# Altium PCB Proiect Dina.PcbDoc
Units mm, origin at the board's own origin, x right, y up, seen from the top; angles counter-clockwise.
Board outline 157.5 x 144.5 mm, 2 copper layers (Top Layer, Bottom Layer); 55 components, 34 nets, 132 pads, 69 vias.
Unrouted connection lines stored in the file: 9.
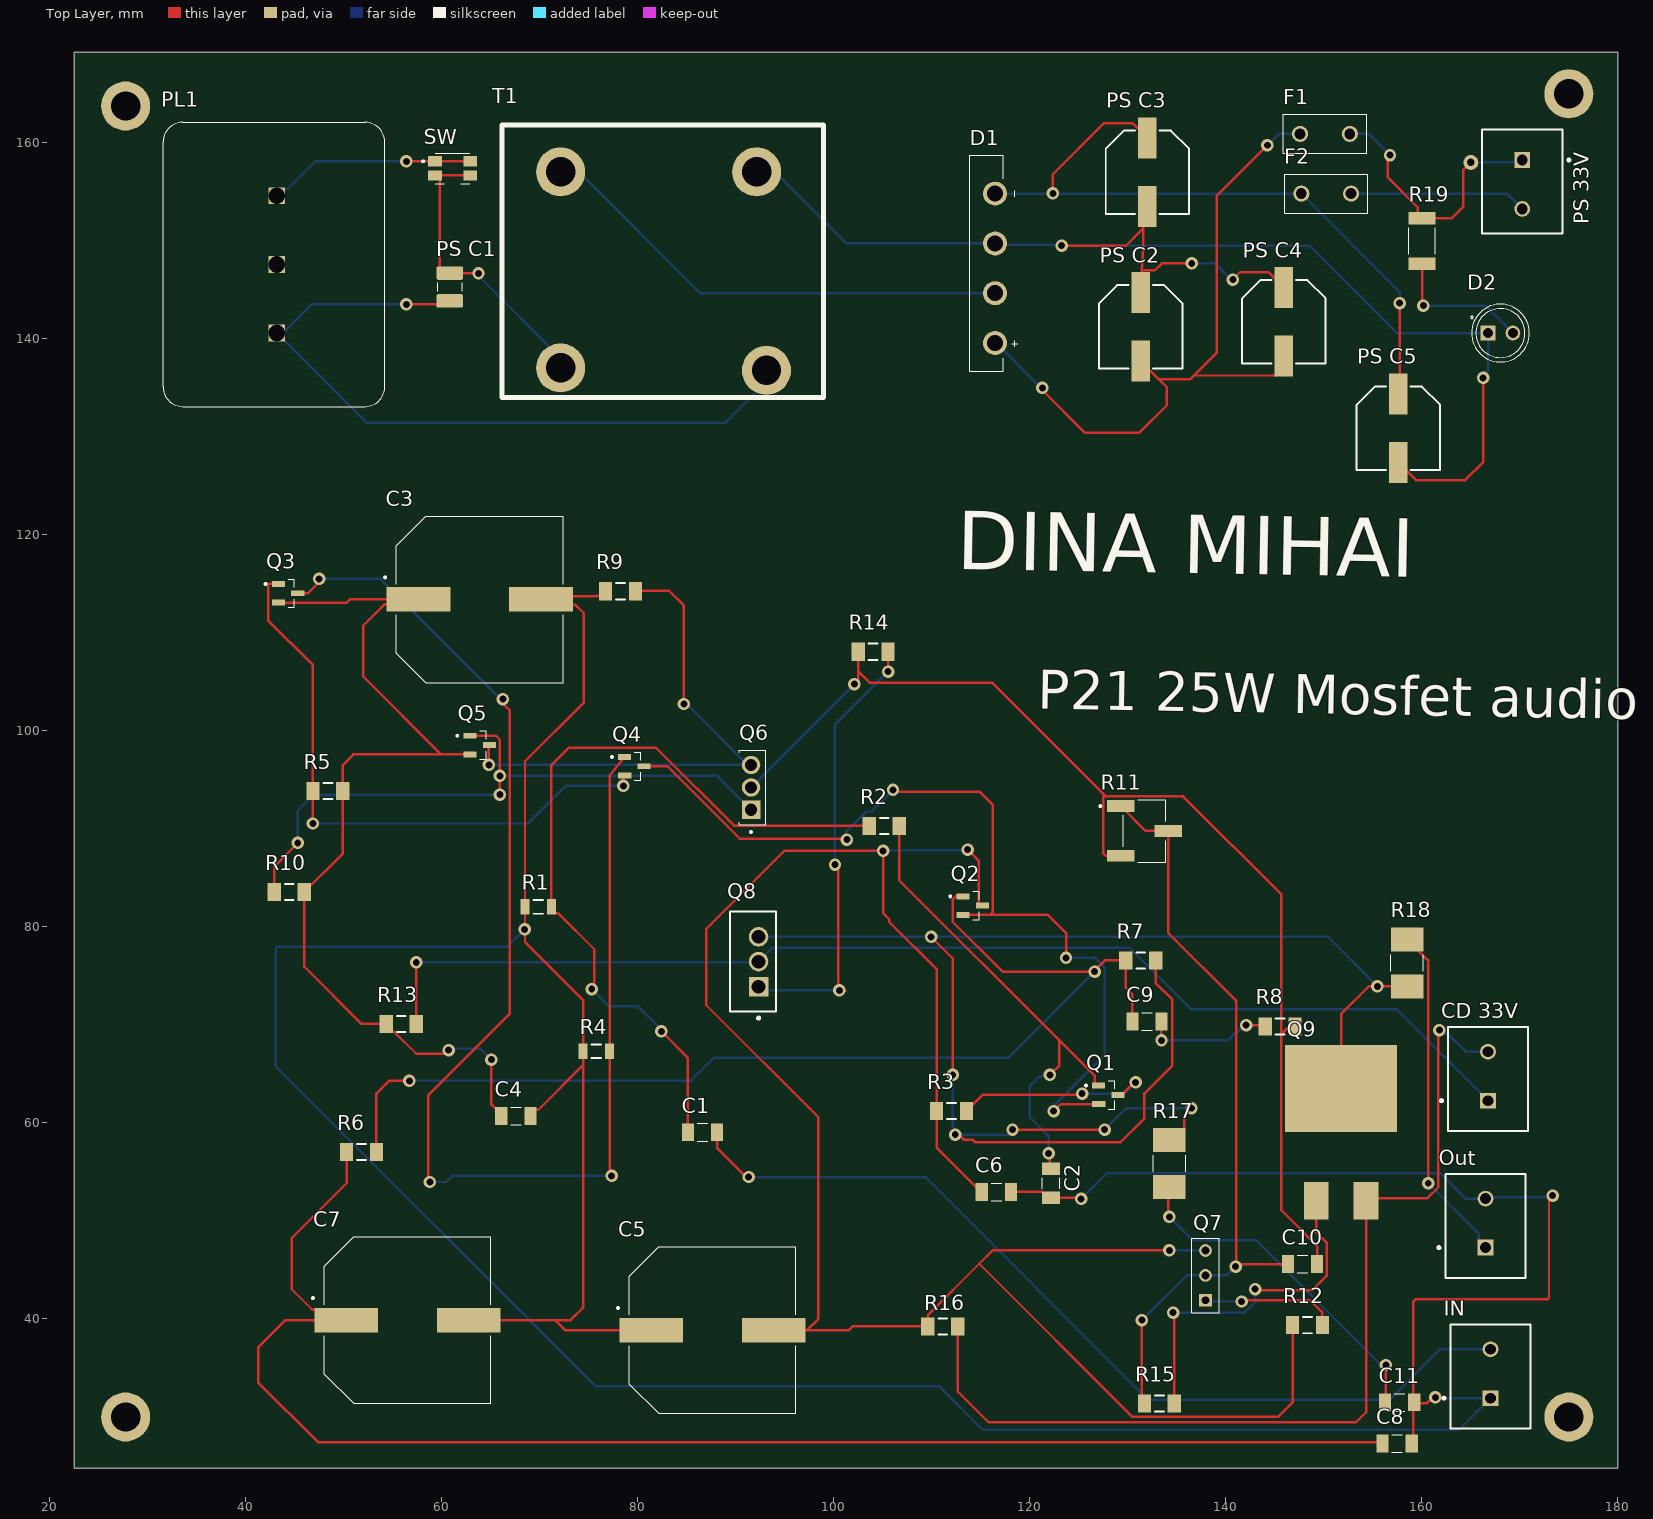
[diagram p0: Top Layer view]
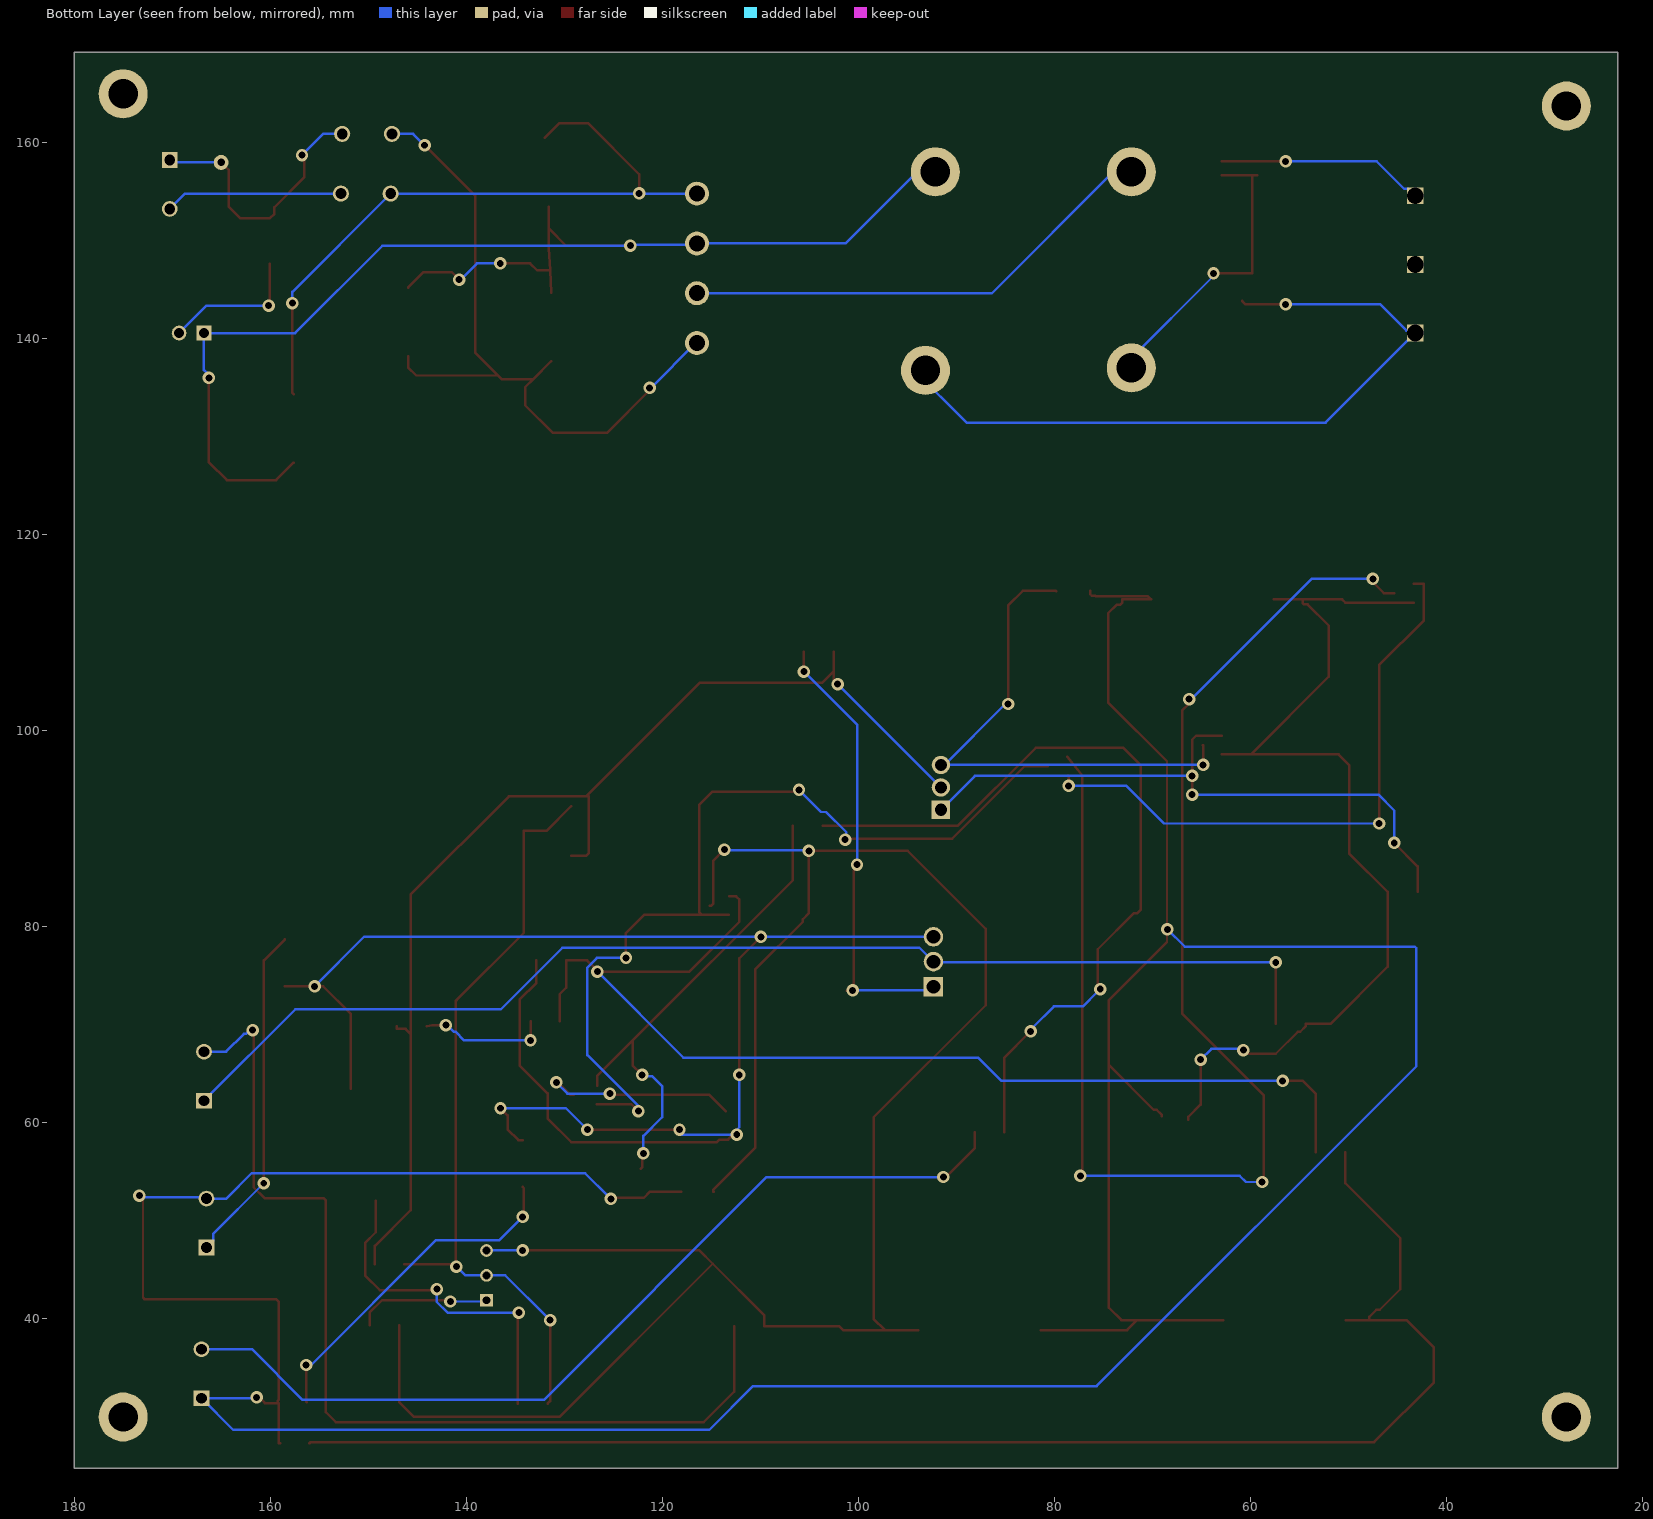
[diagram p1: Bottom Layer view, seen from below]
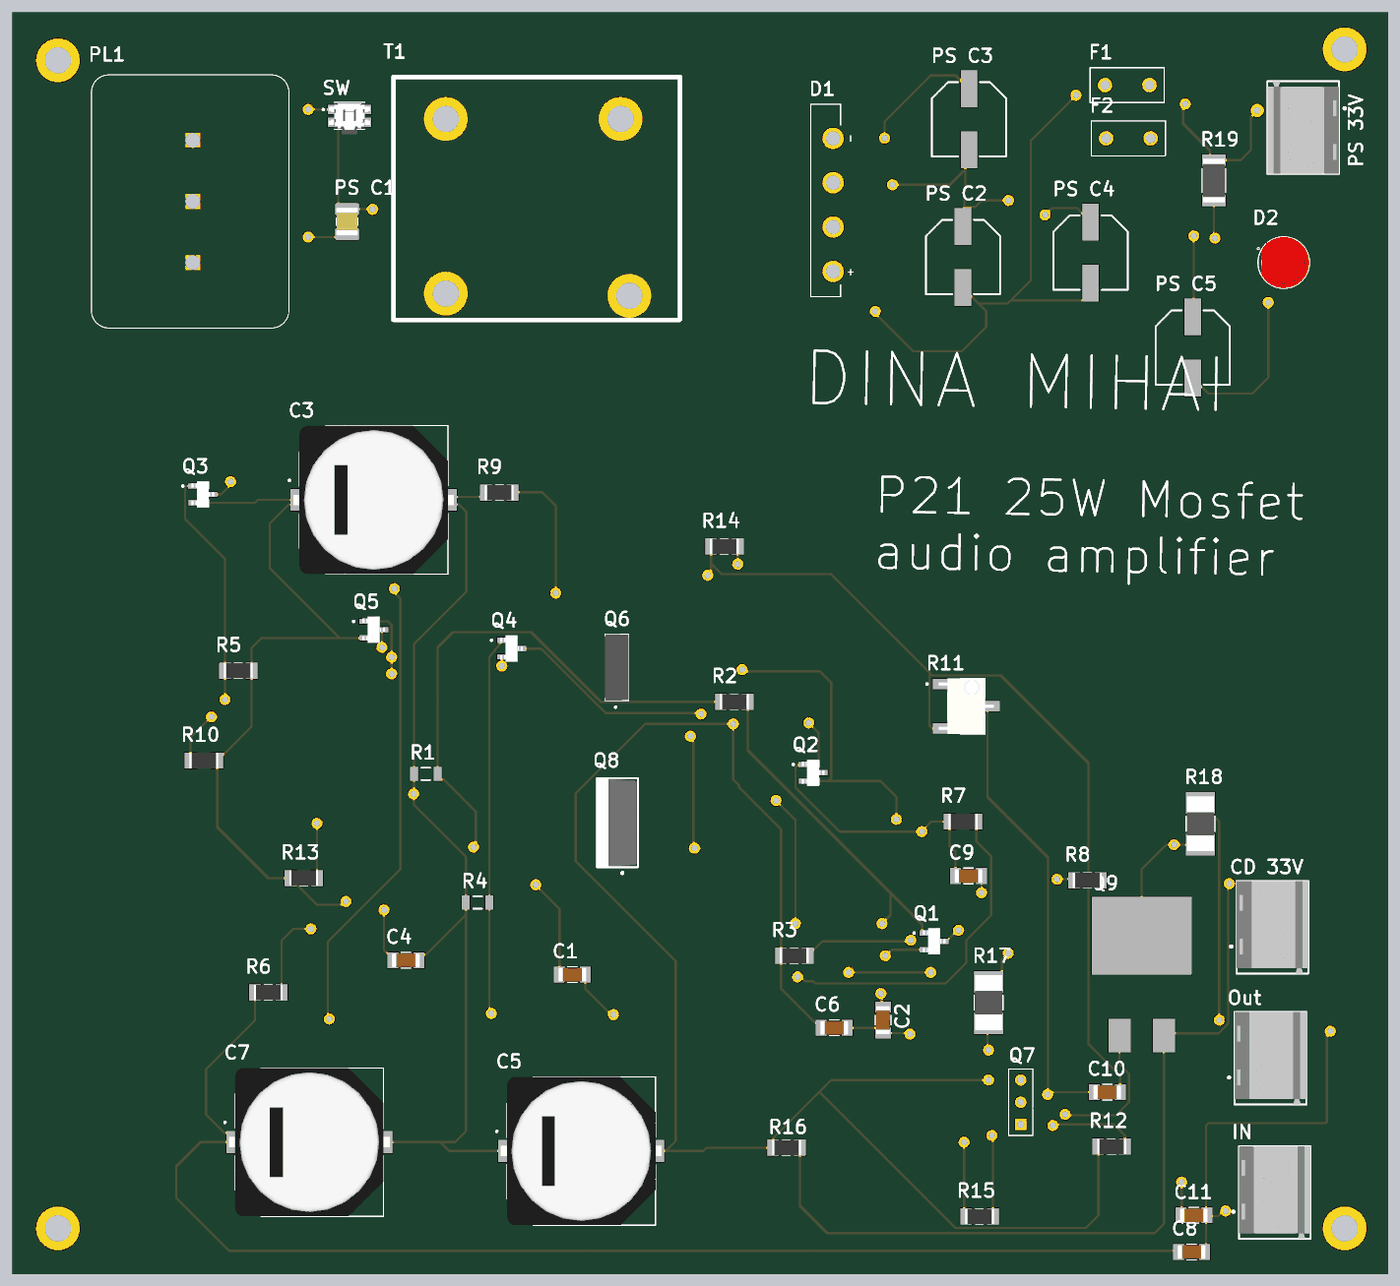
[diagram p2: 3D render of the assembled board from above, using the file's embedded part models]

## Layer stack, top to bottom
Top Solder: solder mask 0.0102, Solder Resist, Dk 3.5
Top Layer: signal copper 0.0356
Dielectric 1: dielectric 0.32, FR-4, Dk 4.8
Bottom Layer: signal copper 0.0356
Bottom Solder: solder mask 0.0102, Solder Resist, Dk 3.5

## Board outline
22.5,24.75 180,24.75 180,169.25 22.5,169.25

## Design rules (kind name [scope] priority, off if disabled: settings)
AssemblyTestPointUsage [All] p1: isadvanced=TRUE
AssemblyTestpoint [All] p1: isadvanced=TRUE testpointundercomponent=TRUE minsize=1.016 maxsize=2.54 preferedsize=1.524 minholesize=0 maxholesize=1.016 preferedholesize=0.813 testpointgrid=0.025 usegrid=TRUE gridtolerance=0 allowsidetop=TRUE allowsidebottom=TRUE
Clearance Clearance_1 [OnMid vs OnMid] p1: gap=0.254 ignorepadtopadclearanceinfootprint=FALSE sourcerule=37 cellrowname=All cellrowtype=0 cellcolname=All cellcoltype=0 innerlayers=TRUE
Clearance Clearance_2 [(ExistsOnLayer('Top Layer') Or ExistsOnLayer('Bottom Layer')) vs (ExistsOnLayer('Top Layer') Or ExistsOnLayer('Bottom Layer'))] p2: gap=0.254 ignorepadtopadclearanceinfootprint=FALSE sourcerule=37 cellrowname=All cellrowtype=0 cellcolname=All cellcoltype=0 outerlayers=TRUE
Clearance [All] p3: gap=0.254 ignorepadtopadclearanceinfootprint=FALSE ismatrix=TRUE
ComponentClearance [All] p1: isadvanced=TRUE gap=0.254 collisioncheckmode=3 verticalgap=0.254 showdistances=FALSE
FabricationTestPointUsage [All] p1: isadvanced=TRUE valid=0 allowmultiple=FALSE
FabricationTestpoint [All] p1: isadvanced=TRUE side=3 testpointundercomponent=TRUE minsize=1.016 maxsize=2.54 preferedsize=1.524 minholesize=0 maxholesize=1.016 preferedholesize=0.813 testpointgrid=0.025 allowsidetop=TRUE allowsidebottom=TRUE usegrid=TRUE gridtolerance=0
FanoutControl Fanout_BGA [IsBGA] p1: isadvanced=TRUE bgadir=Out bgaviamode=Centered fanoutstyle=Auto fanoutdirection=Alternating viagrid=0.025 // Fanout_BGA (Default Rule)
FanoutControl Fanout_LCC [IsLCC] p2: isadvanced=TRUE bgadir=Out bgaviamode=Centered fanoutstyle=Auto fanoutdirection=Alternating viagrid=0.025 // Fanout_LCC (Default Rule)
FanoutControl Fanout_SOIC [IsSOIC] p3: isadvanced=TRUE bgadir=Out bgaviamode=Centered fanoutstyle=Auto fanoutdirection=Alternating viagrid=0.025 // Fanout_SOIC (Default Rule)
FanoutControl Fanout_Small [(CompPinCount < 5)] p4: isadvanced=TRUE bgadir=Out bgaviamode=Centered fanoutstyle=Auto fanoutdirection=OutThenIn viagrid=0.025 // Fanout_Small (Default Rule)
FanoutControl Fanout_Default [All] p5: isadvanced=TRUE bgadir=Out bgaviamode=Centered fanoutstyle=Auto fanoutdirection=Alternating viagrid=0.025 // Fanout_Default (Default Rule)
Height [All] p1: isadvanced=TRUE minheight=0 maxheight=25.4 prefheight=12.7
HoleSize [All] p1: isadvanced=TRUE absolutevalues=TRUE maxlimit=2.54 minlimit=0.025 maxpercent=80.000 minpercent=20.000
HoleToHoleClearance [All] p1: isadvanced=TRUE gap=0.254 allowstackedmicrovias=TRUE
LayerPairs [All] p1: isadvanced=TRUE enforce=TRUE
MinimumSolderMaskSliver [All] p1: isadvanced=TRUE minsoldermaskwidth=0.254
NetAntennae [All] p1: isadvanced=TRUE netantennaetolerance=0
PasteMaskExpansion [All] p1: isadvanced=TRUE expansion=0
PlaneClearance [All] p1: isadvanced=TRUE clearance=0.508
PlaneConnect [All] p1: isadvanced=TRUE planeconnectstyle=Relief reliefexpansion=0.508 reliefentries=4 reliefconductorwidth=0.254 reliefairgap=0.254
PolygonConnect [All] p1: connectstyle=Relief reliefconductorwidth=0.254 reliefentries=4 polygonreliefangle="90 Angle" airgapwidth=0.254
RoutingCorners [All] p1: isadvanced=TRUE cornerstyle=45-Degree minsetback=2.54 maxsetback=2.54
RoutingPriority [All] p1: isadvanced=TRUE routingpriority=0
RoutingVias [All] p1: holewidth=0.711 width=1.27 viastyle="Through Hole" minholewidth=0.711 minwidth=1.27 maxholewidth=0.711 maxwidth=1.27
ShortCircuit [All] p1: isadvanced=TRUE allowed=FALSE
SilkToSilkClearance [All] p1: isadvanced=TRUE silktosilkclearance=0.254
SilkToSolderMaskClearance [IsPad] p1: isadvanced=TRUE minsilkscreentomaskgap=0.254 clearancetoexposedcopper=TRUE
SolderMaskExpansion [All] p1: isadvanced=TRUE expansion=0.102 istentingtop=FALSE
SupplyNets "Schematic Supply Nets" [InNet('GND')] p1: isadvanced=TRUE voltage=0.000
UnRoutedNet [All] p1: isadvanced=TRUE
UnpouredPolygon [All] p1: isadvanced=TRUE
Width [All] p1: maxlimit=0.254 minlimit=0.254 preferedwidth=0.254
4 further rules are at their usual default settings.

## Components (designator, comment, footprint, x,y, rotation, side; value= is the part's Value field where it differs from the comment)
C1 "R82EC3470AA70K10" CAPC3216X160N 86.614,59.055 r180 top
C2 "R82EC3470AA70K10" CAPC3216X160N 122.174,53.848 r90 top
C3 "EEVTG1J471M" CAP_EEVTG1J471M 63.881,113.411 r0 top
C4 "R82EC3470AA70K10" CAPC3216X160N 67.564,60.706 r180 top
C5 "EEVTG1J471M" CAP_EEVTG1J471M 87.63,38.862 r0 top
C6 "R82EC3470AA70K10" CAPC3216X160N 116.586,52.959 r180 top
C7 "EEVTG1J471M" CAP_EEVTG1J471M 56.515,39.878 r0 top
C8 "R82EC3470AA70K10" CAPC3216X160N 157.48,27.305 r180 top
C9 "10" CAPC3216X160N 131.953,70.358 r0 top
C10 "10" CAPC3216X160N 147.828,45.593 r0 top
C11 "R82EC3470AA70K10" CAPC3216X160N 157.734,31.496 r180 top
"CD 33V" "282836-2" TECO-282836-2_V 166.751,64.77 r90 top
D1 "GBU8G" *DIOB_GBU8G_GBU8G(Primary) 116.459,147.193 r270 top
D2 "WP7113ID" LED_WP7113ID 168.021,140.589 r0 top
F1 "36913150000" FUSE_36913150000 150.114,160.909 r0 top
F2 "36913150000" FUSE_36913150000 150.241,154.813 r0 top
IN "282836-2" TECO-282836-2_V 167.005,34.417 r90 top
Out "282836-2" TECO-282836-2_V 166.497,49.784 r90 top
PL1 "PX0686" PL1 54.18,133.089 r90 top
"PS 33V" "282836-2" TECO-282836-2_V 170.25,155.75 r270 top
"PS C1" "CL32C103JIJNNWE" CAPC3225X270N 60.833,145.288 r90 top
"PS C2" "WCAP-ASNP_8X10.5" WCAP-ASNP_8X10.5(DXL) 131.318,141.224 r90 top
"PS C3" "WCAP-ASNP_8X10.5" WCAP-ASNP_8X10.5(DXL) 132,157 r90 top
"PS C4" "WCAP-ASNP_8X10.5" WCAP-ASNP_8X10.5(DXL) 145.923,141.732 r90 top
"PS C5" "WCAP-ASNP_8X10.5" WCAP-ASNP_8X10.5(DXL) 157.607,130.866 r90 top
Q1 "BC860C" SOT95P240X120-3N 128.016,62.865 r0 top
Q2 "BC860C" SOT95P240X120-3N 114.173,82.169 r0 top
Q3 "BC860C" SOT95P240X120-3N 44.323,114.046 r0 top
Q4 "BC860C" SOT95P240X120-3N 79.655,96.393 r0 top
Q5 "BC860C" SOT95P240X120-3N 63.881,98.552 r0 top
Q6 "BD140" TO229P760X270X1364-3 91.722,94.234 r90 top
Q7 "BD139" *TO-126 137.922,44.45 r90 top
Q8 "IRF540N" IFX-PG-TO220-3-904-1 92.329,76.454 r90 top
Q9 "IRF9540NS" *D2PACK 151.765,58.42 r0 top
R1 "47K" RESC3216X60X45LL10T20 69.85,82.042 r0 top
R2 "4.7k" RESC3216X60X45ML15T20 105.156,90.297 r0 top
R3 "1.5k" RESC3216X60X45ML15T20 112.014,61.214 r0 top
R4 "47K" RESC3216X60X45LL10T20 75.772,67.31 r0 top
R5 "360" RESC3216X60X45ML15T20 48.388,93.853 r0 top
R6 "470" RESC3216X60X45ML15T20 51.816,57.023 r0 top
R7 "33K" RESC3216X60X45ML15T20 131.318,76.581 r0 top
R8 "150k" RESC3216X60X45ML15T20 145.543,69.85 r0 top
R9 "15k" RESC3216X60X45ML15T20 78.25,114.25 r0 top
R10 "27" RESC3216X60X45ML15T20 44.45,83.566 r0 top
R11 "3269W-1-102LF" TRIM_3269W-1-102LF 131.697,89.789 r0 top
R12 "10" RESC3216X60X45ML15T20 148.335,39.37 r0 top
R13 "10" RESC3216X60X45ML15T20 55.879,70.104 r0 top
R14 "220" RESC3216X60X45ML15T20 104.014,108.077 r0 top
R15 "220" RESC3216X60X45ML15T20 133.224,31.369 r0 top
R16 "10" RESC3216X60X45ML15T20 111.125,39.243 r0 top
R17 "CRM2512-JW-8R2ELF" RESC6331X80N 134.239,55.857 r90 top
R18 "CRM2512-JW-8R2ELF" RESC6331X80N 158.496,76.327 r90 top
R19 "CR2010-JW-222ELF" RESC5025X70N 160.02,149.987 r90 top
SW "EVQ-P7A01P" SW_EVQ-P7A01P 61.109,157.39 r0 top
T1 "BV EI 306 3366" T1 65.136,133.033 r0 top

## Footprints (in the part's own frame and the unit in brackets; to place one, negate y for a bottom-side part, rotate by r counter-clockwise, add the part's x,y. Pads: shape width x height; smd on the part's side, far side on the other; paste and mask are expansions set on the pad)
*D2PACK [mm]
  rect 2.54x3.81 smd: 1(-2.54,-6.35) 2(2.54,-6.35)
  rect 11.43x8.89 smd: 3(0,5.08)
*DIOB_GBU8G_GBU8G(Primary) [mm]
  round 2.445 hole 1.63: AC1(-2.54,0) AC2(2.54,0) NEG(-7.62,0) POS(7.62,0)
  silkscreen extent -11.53,-2.58 10.52,2.3
*TO-126 [mm]
  rect 1.3x1.3 hole 0.8: 1(-2.54,0)
  round 1.3 hole 0.8: 2(0,0) 3(2.54,0)
  silkscreen extent -3.81,-1.4 3.81,1.4
CAP_EEVTG1J471M [mm]
  rect 6.5x2.5 smd: 1(-6.25,0) 2(6.25,0)
  silkscreen extent -9.75,-8.5 8.5,8.5, body extent -9.2,-8.5 9.2,8.5, height 16.5
CAPC3216X160N [mm]
  rect 1.24x1.82 smd paste+0 mask+0.102: 1(-1.485,0) 2(1.485,0)
  silkscreen extent -0.54,-0.9 0.54,0.9, body extent -1.6,-0.8 1.6,0.8, height 1.6
CAPC3225X270N [mm]
  rrect25% 1.37x2.72 smd paste+0 mask+0.102: 1(-1.421,0) 2(1.421,0)
  silkscreen extent -0.42,-1.25 0.42,1.25, body extent -1.6,-1.25 1.6,1.25, height 2.7
FUSE_36913150000 [mm]
  round 1.65 hole 1.1: 1(-2.54,0) 2(2.54,0)
  silkscreen extent -4.25,-2 4.25,2
IFX-PG-TO220-3-904-1 [mm] "TO,flange mount,2.54 mm pitch, 3 pin, 10.16 mm L X 4.57 mm W X 20.56 mm H body"
  rect 1.99x1.99 hole 1.39 paste-2539.97 mask+0: 1(-2.54,0)
  round 1.99 hole 1.39 paste-2539.97 mask+0: 2(0,0) 3(2.54,0)
  silkscreen extent -5.87,-1.8 5.1,2.9, body extent -5.16,-1.72 5.16,2.86, height 19.84
LED_WP7113ID [mm]
  round 1.508 hole 1: A(1.27,0)
  rect 1.508x1.508 / inner round 1.508 / far side rect 1.508x1.508 hole 1: C(-1.27,0)
  silkscreen extent -3.03,-2.95 2.95,2.95, body extent -2.5,-2.95 2.95,2.95, height 9.6
PL1 [mm]
  rect 1.7x1.7 / inner round 1.7 / far side rect 1.7x1.7 hole 1.7 mask+0.05: 1(7.5,11) 2(21.5,11) E(14.5,11)
  silkscreen extent 0,0 29,22.6
RESC3216X60X45LL10T20 [mm] "Chip Resistor, 2-Leads, Body 3.20x1.60mm, IPC High Density"
  rect 0.9x1.6 smd: 1(-1.35,0) 2(1.35,0)
  silkscreen extent -0.5,-0.7 0.5,0.7, body extent -1.65,-0.85 1.65,0.85, height 0.6
RESC3216X60X45ML15T20 [mm] "Chip Resistor, 2-Leads, Body 3.3x1.75mm, IPC Low Density"
  rect 1.35x1.85 smd: 1(-1.525,0) 2(1.525,0)
  silkscreen extent -0.45,-0.82 0.45,0.82, body extent -1.65,-0.87 1.65,0.87, height 0.6
RESC5025X70N [mm]
  rect 1.26x2.72 smd paste+0 mask+0.102: 1(-2.325,0) 2(2.325,0)
  silkscreen extent -1.37,-1.35 1.37,1.35, body extent -2.5,-1.25 2.5,1.25, height 0.7
RESC6331X80N [mm]
  rect 2.44x3.32 smd: 1(-2.39,0) 2(2.39,0)
  silkscreen extent -0.85,-1.65 0.85,1.65, body extent -3.15,-1.55 3.15,1.55, height 0.8
SOT95P240X120-3N [mm]
  rect 1.34x0.6 smd paste+0 mask+0.102: 1(-0.99,0.95) 2(-0.98,-0.95) 3(0.99,0)
  silkscreen extent -2.39,-1.45 0.65,1.45, body extent -1.3,-1.52 1.3,1.52, height 1.3
SW_EVQ-P7A01P [mm]
  rect 1.4x1.05 smd: 1_1(-1.8,0.725) 1_2(1.8,0.725) 2_1(-1.8,-0.725) 2_2(1.8,-0.725)
  silkscreen extent -3.1,-1.56 1.75,1.56, body extent -2.35,-2.1 2.35,1.45, height 1.35
T1 [mm]
  round 5 hole 3 mask+0.05: 1(7,24) 5(27,24) 7(28,3.75) 9(7,4)
  silkscreen extent 1,1 33.8,28.8
TECO-282836-2_V [mm] "Female Header, Pitch 5mm, 1 x 2 Position, Height 10mm"
  rect 1.6x1.6 hole 1.1: 1(-2.5,0)
  round 1.6 hole 1.1: 2(2.5,0)
  silkscreen extent -5.6,-4.1 5,4.87, body extent -5.6,-4.1 5,4.1, height 10
TO229P760X270X1364-3 [mm]
  rect 1.875x1.875 / inner round 1.875 / far side rect 1.875x1.875 hole 1.25: 1(-2.29,0.155)
  round 1.875 hole 1.25: 2(0,0.155) 3(2.29,0.155)
  silkscreen extent -4.65,-1.35 3.8,1.35, body extent -3.8,-1.35 3.8,1.35, height 13.64
TRIM_3269W-1-102LF [mm]
  rect 2.79x1.19 smd paste+0 mask+0.102: 1(-2.415,2.54) 2(2.415,0) 3(-2.415,-2.54)
  silkscreen extent -4.6,-3.17 2.16,3.17, body extent -3.18,-3.17 3.18,3.17, height 8.46
WCAP-ASNP_8X10.5(DXL) [mm]
  rect 4.2x1.9 smd paste+0 mask+0.102: 1(3.5,0) 2(-3.5,0)
  silkscreen extent -4.25,-4.25 4.25,4.25

## Part data
C1 C2 C4 C6 C8 C9 C10 C11: library part 1206Y0630100KCR, "CAP CER 10PF 63V C0G/NP0 1206", Package="3216 Knowles Syfer", Check_prices=https://www.snapeda.com/parts/1206Y0630100KCR/Knowles+Syfer/view-part/?ref=eda, MF="Knowles Syfer", MP=1206Y0630100KCR, SnapEDA_Link=https://www.snapeda.com/parts/1206Y0630100KCR/Knowles+Syfer/view-part/?ref=snap
C3 C5 C7: "470ÂµF 63V Aluminum Electrolytic Capacitors Radial, Can - SMD 180mOhm @ 100kHz 2000 Hrs @ 125Â°C", Package="RADIAL-2 Panasonic", Availability="In Stock", Check_prices=https://www.snapeda.com/parts/EEV-TG1J471M/Panasonic/view-part/2306879/?ref=eda, MF=Panasonic, MP=EEV-TG1J471M, Price=None, Purchase-URL=https://pricing.snapeda.com/search/part/EEV-TG1J471M/?ref=eda, SnapEDA_Link=https://www.snapeda.com/parts/EEV-TG1J471M/Panasonic/view-part/2306879/?ref=snap
"CD 33V" IN Out "PS 33V": library part CMP-1684-00017-1, "Female Header, Pitch 5 mm, 1 x 2 Position, Height 10 mm, Tail Length 3.5 mm, Rohs, Bulk", Color=Green, Current=13.5A, Manufacturer="TE Connectivity", Package Description="Female Header, Pitch 5 mm, 1 x 2 Position, Height 10 mm, Tail Length 3.5 mm", Package Reference=THD, Standard Package=300, Voltage=300V, 3D Model=282836-2.pdf, Category=Connectors,Interconnects, Clamp Material - Plating=Brass-NickelPlated, Contact Material - Plating=Brass-TinPlated, Datasheet URL=http://www.te.com.cn/commerce/DocumentDelivery/DDEController?Action=showdoc&DocId=Catalog+Section%7F1308389_EUROSTYLE_TERMINAL_BLOCKS%7F0607%7Fpdf%7FEnglish%7FENG_CS_1308389_EUROSTYLE_TERMINAL_BLOCKS_0607.pdf%7F282836-2, Dynamic Catalog=BuchananSeries, Family=TerminalBlocks-WiretoBoard, Featured Product=EurostyleTerminalBlockConnectors, Features=Interlocking(Side), Housing Material=Polyamide(PA66),Nylon6/6, Manufacturer URL=http://www.te.com, Mating Orientation=HorizontalwithBoard, Mounting Type=ThroughHole, Number of Levels=1, Other Names="5ULV-02B / A98076", Packaging=Bulk, Pitch="0.197\"(5.00mm)", Positions Per Level=2, Product Training Modules=Wire-to-BoardEurostyleTerminalBlocks, RoHS Information=282836-2StatementofCompliance, Screw Material - Plating=Brass-NickelPlated, Screw Thread=M3, Series=Buchanan, Torque - Screw=0.68Nm(6Lb-In), Wire Gauge=16-30AWG, Wire Termination=Screw-RisingCageClamp
D2: "Red 617nm LED Indication - Discrete 2V Radial", Package="Radial Kingbright", Availability="In Stock", Check_prices=https://www.snapeda.com/parts/WP7113ID/Kingbright/view-part/?ref=eda, MF=Kingbright, MP=WP7113ID, Price=None, Purchase-URL=https://pricing.snapeda.com/search/part/WP7113ID/?ref=eda, SnapEDA_Link=https://www.snapeda.com/parts/WP7113ID/Kingbright/view-part/?ref=snap
F1 F2: "3.15 A 300 V AC DC Fuse Board Mount (Cartridge Style Excluded) Through Hole Radial, Box", Package=None, Check_prices=https://www.snapeda.com/parts/36913150000/Littelfuse/view-part/?ref=eda, MF=Littelfuse, MP=36913150000, SnapEDA_Link=https://www.snapeda.com/parts/36913150000/Littelfuse/view-part/?ref=snap
"PS C1": "Multilayer Ceramic Capacitors MLCC - SMD/SMT 1210/3225,C0G,10nF,1000V,+/-5%", Package="SMD-2 Samsung", Check_prices=https://www.snapeda.com/parts/CL32C103JIJNNWE/Samsung/view-part/?ref=eda, MF=Samsung, MP=CL32C103JIJNNWE, SnapEDA_Link=https://www.snapeda.com/parts/CL32C103JIJNNWE/Samsung/view-part/?ref=snap
"PS C2" "PS C3" "PS C4" "PS C5": "CAP ALUM 22UF 20% 50V SMD", Package="Radial WÃ¼rth Elektronik", Check_prices=https://www.snapeda.com/parts/865250653010/W%25C3%25BCrth+Elektronik+Midcom/view-part/?ref=eda, MF="WÃ¼rth Elektronik", MP=865250653010, SnapEDA_Link=https://www.snapeda.com/parts/865250653010/W%25C3%25BCrth+Elektronik+Midcom/view-part/?ref=snap
Q1 Q2 Q3 Q4 Q5: "BJT, SOT-23, 45V, 100mA, PNP, 0.25W, 150Â°C", Package="SOT-23 Diotec", Check_prices=https://www.snapeda.com/parts/BC860C/Diotec/view-part/?ref=eda, MF="Diotec Semiconductor", MP=BC860C, SnapEDA_Link=https://www.snapeda.com/parts/BC860C/Diotec/view-part/?ref=snap
Q6: "Bipolar (BJT) Transistor PNP 80 V 1.5 A - 1.25 W Through Hole TO-126-3", Package="TO-225-3 ON Semiconductor", Check_prices=https://www.snapeda.com/parts/BD140/Onsemi/view-part/?ref=eda, MF="ON Semiconductor", MP=BD140, SnapEDA_Link=https://www.snapeda.com/parts/BD140/Onsemi/view-part/?ref=snap
Q7: "Bipolar (BJT) Transistor NPN 80 V 1.5 A - 1.25 W Through Hole SOT-32-3", Package="TO-126 STMicroelectronics", Check_prices=https://www.snapeda.com/parts/BD139/STMicroelectronics/view-part/?ref=eda, MF=STMicroelectronics, MP=BD139, SnapEDA_Link=https://www.snapeda.com/parts/BD139/STMicroelectronics/view-part/?ref=snap
Q8: "Insulated-Gate Field-Effect Transistor (IGFET), N-Channel, Enhancement, Body Diode, Pin 1 Gate, 2 Drain, 3 Source, 3 Pins", Manufacturer="Infineon Technologies", Manufacturer Order Number=IRF540N, PackageReference=PG-TO220-3-904
Q9: "P-Channel 100V 23A (Tc) 3.1W (Ta), 110W (Tc) Surface Mount D2PAK", Package="TO-263 International Rectifier", Check_prices=https://www.snapeda.com/parts/IRF9540NS/International+Rectifier/view-part/?ref=eda, MF="International Rectifier", MP=IRF9540NS, SnapEDA_Link=https://www.snapeda.com/parts/IRF9540NS/International+Rectifier/view-part/?ref=snap
R1 R4: library part CMP-2003-02213-1, Manufacturer="Vishay Dale", Part Number=CRCW120647K0FKEA
R2: library part CMP-2100-03618-1, "Chip Resistor, 4.7 KOhm, +/- 1%, 0.25 W, -55 to 155 degC, 1206 (3216 Metric), RoHS, Tape and Reel", Case Code (Imperial)=1206, Case Code (Metric)=3216, Manufacturer="Vishay Semiconductor", Max Operating Temperature=155degC, Max Power Dissipation=250mW, Min Operating Temperature=-55degC, Package Description="2-Pin Surface Mount Device, Body 3.15 x 1.6 mm", Package Quantity=10, Package Reference=1206.0, Resistance=4.7KOhm, Temperature Coefficient=100ppm/degreesC, Tolerance=1%, Voltage Rating=200V, Case/Package=1206, Composition=ThickFilm, Contact Plating=Tin, Datasheet URL=http://www.vishay.com/docs/20035/dcrcwe3.pdf, Datasheet Version=41061.0, Depth=1.6mm, Height=0.55mm, Lead Free=LeadFree, Length=3.2mm, Manufacturer URL=http://www.vishay.com/, Military Standard=Not, Mount=SurfaceMount, Number of Terminations=2, Packaging=TapeandReel, Power Rating=250mW, Radiation Hardening=No, REACH SVHC=Unknown, RoHSCompliant=true, Termination=SMD/SMT, Voltage Rating (DC)=200V, Weight=0.000353oz, Width=1.6mm
R3: library part CMP-2100-03618-1, "Chip Resistor, 4.7 KOhm, +/- 1%, 0.25 W, -55 to 155 degC, 1206 (3216 Metric), RoHS, Tape and Reel", Case Code (Imperial)=1206, Case Code (Metric)=3216, Manufacturer="Vishay Semiconductor", Max Operating Temperature=155degC, Max Power Dissipation=250mW, Min Operating Temperature=-55degC, Package Description="2-Pin Surface Mount Device, Body 3.15 x 1.6 mm", Package Quantity=10, Package Reference=1206.0, Resistance=1.5KOhm, Temperature Coefficient=100ppm/degreesC, Tolerance=1%, Voltage Rating=200V, Case/Package=1206, Composition=ThickFilm, Contact Plating=Tin, Datasheet URL=http://www.vishay.com/docs/20035/dcrcwe3.pdf, Datasheet Version=41061.0, Depth=1.6mm, Height=0.55mm, Lead Free=LeadFree, Length=3.2mm, Manufacturer URL=http://www.vishay.com/, Military Standard=Not, Mount=SurfaceMount, Number of Terminations=2, Packaging=TapeandReel, Power Rating=250mW, Radiation Hardening=No, REACH SVHC=Unknown, RoHSCompliant=true, Termination=SMD/SMT, Voltage Rating (DC)=200V, Weight=0.000353oz, Width=1.6mm
R5: library part CMP-2100-03618-1, "Chip Resistor, 4.7 KOhm, +/- 1%, 0.25 W, -55 to 155 degC, 1206 (3216 Metric), RoHS, Tape and Reel", Case Code (Imperial)=1206, Case Code (Metric)=3216, Manufacturer="Vishay Semiconductor", Max Operating Temperature=155degC, Max Power Dissipation=250mW, Min Operating Temperature=-55degC, Package Description="2-Pin Surface Mount Device, Body 3.15 x 1.6 mm", Package Quantity=10, Package Reference=1206.0, Resistance=360Ohm, Temperature Coefficient=100ppm/degreesC, Tolerance=1%, Voltage Rating=200V, Case/Package=1206, Composition=ThickFilm, Contact Plating=Tin, Datasheet URL=http://www.vishay.com/docs/20035/dcrcwe3.pdf, Datasheet Version=41061.0, Depth=1.6mm, Height=0.55mm, Lead Free=LeadFree, Length=3.2mm, Manufacturer URL=http://www.vishay.com/, Military Standard=Not, Mount=SurfaceMount, Number of Terminations=2, Packaging=TapeandReel, Power Rating=250mW, Radiation Hardening=No, REACH SVHC=Unknown, RoHSCompliant=true, Termination=SMD/SMT, Voltage Rating (DC)=200V, Weight=0.000353oz, Width=1.6mm
R6: library part CMP-2100-03618-1, "Chip Resistor, 4.7 KOhm, +/- 1%, 0.25 W, -55 to 155 degC, 1206 (3216 Metric), RoHS, Tape and Reel", Case Code (Imperial)=1206, Case Code (Metric)=3216, Manufacturer="Vishay Semiconductor", Max Operating Temperature=155degC, Max Power Dissipation=250mW, Min Operating Temperature=-55degC, Package Description="2-Pin Surface Mount Device, Body 3.15 x 1.6 mm", Package Quantity=10, Package Reference=1206.0, Resistance=470Ohm, Temperature Coefficient=100ppm/degreesC, Tolerance=1%, Voltage Rating=200V, Case/Package=1206, Composition=ThickFilm, Contact Plating=Tin, Datasheet URL=http://www.vishay.com/docs/20035/dcrcwe3.pdf, Datasheet Version=41061.0, Depth=1.6mm, Height=0.55mm, Lead Free=LeadFree, Length=3.2mm, Manufacturer URL=http://www.vishay.com/, Military Standard=Not, Mount=SurfaceMount, Number of Terminations=2, Packaging=TapeandReel, Power Rating=250mW, Radiation Hardening=No, REACH SVHC=Unknown, RoHSCompliant=true, Termination=SMD/SMT, Voltage Rating (DC)=200V, Weight=0.000353oz, Width=1.6mm
R7: library part CMP-2100-03618-1, "Chip Resistor, 4.7 KOhm, +/- 1%, 0.25 W, -55 to 155 degC, 1206 (3216 Metric), RoHS, Tape and Reel", Case Code (Imperial)=1206, Case Code (Metric)=3216, Manufacturer="Vishay Semiconductor", Max Operating Temperature=155degC, Max Power Dissipation=250mW, Min Operating Temperature=-55degC, Package Description="2-Pin Surface Mount Device, Body 3.15 x 1.6 mm", Package Quantity=10, Package Reference=1206.0, Resistance=33KOhm, Temperature Coefficient=100ppm/degreesC, Tolerance=1%, Voltage Rating=200V, Case/Package=1206, Composition=ThickFilm, Contact Plating=Tin, Datasheet URL=http://www.vishay.com/docs/20035/dcrcwe3.pdf, Datasheet Version=41061.0, Depth=1.6mm, Height=0.55mm, Lead Free=LeadFree, Length=3.2mm, Manufacturer URL=http://www.vishay.com/, Military Standard=Not, Mount=SurfaceMount, Number of Terminations=2, Packaging=TapeandReel, Power Rating=250mW, Radiation Hardening=No, REACH SVHC=Unknown, RoHSCompliant=true, Termination=SMD/SMT, Voltage Rating (DC)=200V, Weight=0.000353oz, Width=1.6mm
R8: library part CMP-2100-03618-1, "Chip Resistor, 4.7 KOhm, +/- 1%, 0.25 W, -55 to 155 degC, 1206 (3216 Metric), RoHS, Tape and Reel", Case Code (Imperial)=1206, Case Code (Metric)=3216, Manufacturer="Vishay Semiconductor", Max Operating Temperature=155degC, Max Power Dissipation=250mW, Min Operating Temperature=-55degC, Package Description="2-Pin Surface Mount Device, Body 3.15 x 1.6 mm", Package Quantity=10, Package Reference=1206.0, Resistance=150KOhm, Temperature Coefficient=100ppm/degreesC, Tolerance=1%, Voltage Rating=200V, Case/Package=1206, Composition=ThickFilm, Contact Plating=Tin, Datasheet URL=http://www.vishay.com/docs/20035/dcrcwe3.pdf, Datasheet Version=41061.0, Depth=1.6mm, Height=0.55mm, Lead Free=LeadFree, Length=3.2mm, Manufacturer URL=http://www.vishay.com/, Military Standard=Not, Mount=SurfaceMount, Number of Terminations=2, Packaging=TapeandReel, Power Rating=250mW, Radiation Hardening=No, REACH SVHC=Unknown, RoHSCompliant=true, Termination=SMD/SMT, Voltage Rating (DC)=200V, Weight=0.000353oz, Width=1.6mm
R9: library part CMP-2100-03618-1, "Chip Resistor, 4.7 KOhm, +/- 1%, 0.25 W, -55 to 155 degC, 1206 (3216 Metric), RoHS, Tape and Reel", Case Code (Imperial)=1206, Case Code (Metric)=3216, Manufacturer="Vishay Semiconductor", Max Operating Temperature=155degC, Max Power Dissipation=250mW, Min Operating Temperature=-55degC, Package Description="2-Pin Surface Mount Device, Body 3.15 x 1.6 mm", Package Quantity=10, Package Reference=1206.0, Resistance=15KOhm, Temperature Coefficient=100ppm/degreesC, Tolerance=1%, Voltage Rating=200V, Case/Package=1206, Composition=ThickFilm, Contact Plating=Tin, Datasheet URL=http://www.vishay.com/docs/20035/dcrcwe3.pdf, Datasheet Version=41061.0, Depth=1.6mm, Height=0.55mm, Lead Free=LeadFree, Length=3.2mm, Manufacturer URL=http://www.vishay.com/, Military Standard=Not, Mount=SurfaceMount, Number of Terminations=2, Packaging=TapeandReel, Power Rating=250mW, Radiation Hardening=No, REACH SVHC=Unknown, RoHSCompliant=true, Termination=SMD/SMT, Voltage Rating (DC)=200V, Weight=0.000353oz, Width=1.6mm
R10: library part CMP-2100-03618-1, "Chip Resistor, 4.7 KOhm, +/- 1%, 0.25 W, -55 to 155 degC, 1206 (3216 Metric), RoHS, Tape and Reel", Case Code (Imperial)=1206, Case Code (Metric)=3216, Manufacturer="Vishay Semiconductor", Max Operating Temperature=155degC, Max Power Dissipation=250mW, Min Operating Temperature=-55degC, Package Description="2-Pin Surface Mount Device, Body 3.15 x 1.6 mm", Package Quantity=10, Package Reference=1206.0, Resistance=27Ohm, Temperature Coefficient=100ppm/degreesC, Tolerance=1%, Voltage Rating=200V, Case/Package=1206, Composition=ThickFilm, Contact Plating=Tin, Datasheet URL=http://www.vishay.com/docs/20035/dcrcwe3.pdf, Datasheet Version=41061.0, Depth=1.6mm, Height=0.55mm, Lead Free=LeadFree, Length=3.2mm, Manufacturer URL=http://www.vishay.com/, Military Standard=Not, Mount=SurfaceMount, Number of Terminations=2, Packaging=TapeandReel, Power Rating=250mW, Radiation Hardening=No, REACH SVHC=Unknown, RoHSCompliant=true, Termination=SMD/SMT, Voltage Rating (DC)=200V, Weight=0.000353oz, Width=1.6mm
R11: "1/4 Sq, SMD, TRIMMER, Cermet, 12 Turns, 1 Kilohms", Package="SMD-3 Bourns", Check_prices=https://www.snapeda.com/parts/3269W-1-102LF/Bourns/view-part/?ref=eda, MF=Bourns, MP=3269W-1-102LF, SnapEDA_Link=https://www.snapeda.com/parts/3269W-1-102LF/Bourns/view-part/?ref=snap
R12 R13 R16: library part CMP-2100-03618-1, "Chip Resistor, 4.7 KOhm, +/- 1%, 0.25 W, -55 to 155 degC, 1206 (3216 Metric), RoHS, Tape and Reel", Case Code (Imperial)=1206, Case Code (Metric)=3216, Manufacturer="Vishay Semiconductor", Max Operating Temperature=155degC, Max Power Dissipation=250mW, Min Operating Temperature=-55degC, Package Description="2-Pin Surface Mount Device, Body 3.15 x 1.6 mm", Package Reference=1206.0, Resistance=10Ohm, Temperature Coefficient=100ppm/degreesC, Tolerance=1%, Voltage Rating=200V, Case/Package=1206, Composition=ThickFilm, Contact Plating=Tin, Datasheet URL=http://www.vishay.com/docs/20035/dcrcwe3.pdf, Datasheet Version=41061.0, Depth=1.6mm, Height=0.55mm, Lead Free=LeadFree, Length=3.2mm, Manufacturer URL=http://www.vishay.com/, Military Standard=Not, Mount=SurfaceMount, Number of Terminations=2, Package Quantity=10, Packaging=TapeandReel, Power Rating=250mW, Radiation Hardening=No, REACH SVHC=Unknown, RoHSCompliant=true, Termination=SMD/SMT, Voltage Rating (DC)=200V, Weight=0.000353oz, Width=1.6mm
R14 R15: library part CMP-2100-03618-1, "Chip Resistor, 4.7 KOhm, +/- 1%, 0.25 W, -55 to 155 degC, 1206 (3216 Metric), RoHS, Tape and Reel", Case Code (Imperial)=1206, Case Code (Metric)=3216, Manufacturer="Vishay Semiconductor", Max Operating Temperature=155degC, Max Power Dissipation=250mW, Min Operating Temperature=-55degC, Package Description="2-Pin Surface Mount Device, Body 3.15 x 1.6 mm", Package Quantity=10, Package Reference=1206.0, Resistance=220Ohm, Temperature Coefficient=100ppm/degreesC, Tolerance=1%, Voltage Rating=200V, Case/Package=1206, Composition=ThickFilm, Contact Plating=Tin, Datasheet URL=http://www.vishay.com/docs/20035/dcrcwe3.pdf, Datasheet Version=41061.0, Depth=1.6mm, Height=0.55mm, Lead Free=LeadFree, Length=3.2mm, Manufacturer URL=http://www.vishay.com/, Military Standard=Not, Mount=SurfaceMount, Number of Terminations=2, Packaging=TapeandReel, Power Rating=250mW, Radiation Hardening=No, REACH SVHC=Unknown, RoHSCompliant=true, Termination=SMD/SMT, Voltage Rating (DC)=200V, Weight=0.000353oz, Width=1.6mm
R17 R18: "8.2 Ohms Â±5% 2W Chip Resistor 2512 (6432 Metric) Current Sense Thick Film", Package="6331 Bourns", Check_prices=https://www.snapeda.com/parts/CRM2512-JW-8R2ELF/Bourns/view-part/?ref=eda, Digi-Key_Part_Number=118-CRM2512-JW-8R2ELFTR-ND, MF=Bourns, MP=CRM2512-JW-8R2ELF, Purchase-URL=https://pricing.snapeda.com/search/part/CRM2512-JW-8R2ELF/?ref=eda, SnapEDA_Link=https://www.snapeda.com/parts/CRM2512-JW-8R2ELF/Bourns/view-part/?ref=snap
R19: "2.2 kOhms Â±5% 0.5W, 1/2W Chip Resistor 2010 (5025 Metric) Thick Film", Package="5025 Bourns", Check_prices=https://www.snapeda.com/parts/CR2010-JW-222ELF/Bourns/view-part/?ref=eda, MF=Bourns, MP=CR2010-JW-222ELF, SnapEDA_Link=https://www.snapeda.com/parts/CR2010-JW-222ELF/Bourns/view-part/?ref=snap
SW: "Switch;Tactile;3.5x2.9mm;Right Angle;Light Touch Switch", Package=None, Check_prices=https://www.snapeda.com/parts/EVQ-P7A01P/Panasonic+Electronic+Components/view-part/?ref=eda, MF="Panasonic Electronic Components", MP=EVQ-P7A01P, SnapEDA_Link=https://www.snapeda.com/parts/EVQ-P7A01P/Panasonic+Electronic+Components/view-part/?ref=snap
D1: Check_prices=https://www.snapeda.com/parts/GBU8G/Diotec/view-part/?ref=eda, SnapEDA_Link=https://www.snapeda.com/parts/GBU8G/Diotec/view-part/?ref=snap

## Free pads (board coordinates)
  round 5 hole 3: 2(27.75,30) 3(27.75,163.75) 4(175,165) q(175,30)
  round 1.524 hole 0.762: 6(165,158)

## Via types
v1: diameter 1.27, hole 0.711, Top Layer to Bottom Layer, 69 vias

## Nets (pads, with @x,y where several pads share a name; then routed paths per layer and width w, separated by ;. In a path a pad name is that pad's centre, name@x,y a point inside that pad or via, vN(x,y) a via of type N, cw(c..) or ccw(c..) an arc to the next point about the centre after c; other vN are vias at no path point)
GND: "PS C2.1" "PS C3.2" "PS C4.1" "PS C5.2" C2.1 C3.2 C4.1 C5.1 C6.1 C7.2 C8.1 C11.1 D1.AC1 D2.C IN.1 Out.2 R1.1 R4.1 R9.1 T1.5 | length 538.8
  Top Layer w0.254: C7.2 71.552,39.878 ; C4.1 69.049,60.848 69.542,61.341 69.85,61.341 74.422,65.913 ; R9.1@76.327,114.3 76.327,113.941 76.177,113.791 75.818,113.791 75.777,113.75 70.47,113.75 C3.2 73.089,113.411 73.089,113.052 73.254,112.887 73.613,112.887 74.5,112 74.5,102.901 68.5,96.901 R1.1 68.5,78.461 74.422,72.539 R4.1 74.422,65.913 ; C5.1 72.568,38.862 71.552,39.878 ; C6.1 121.288,52.959 121.884,52.363 C2.1 125.137,52.363 v1(125.25,52.25) ; v1(123.25,149.5) 129.815,149.5 131.572,151.257 ; 131.318,144.724 131.445,146.979 131.572,149.225 131.572,151.257 ; 131.445,146.975 132.751,146.975 133.477,147.701 v1@136.398,147.701 ; 131.572,153.472 131.572,151.257 ; v1(140.716,146.05) 141.478,146.812 144.343,146.812 145.923,145.232 ; 157.607,127.366 159.391,125.582 164.422,125.582 166.243,127.403 v1(166.243,136.017) ; C8.1 159.131,27.305 159.131,31.408 160.53,31.408 161.122,32 v1@161.5,32 ; C11.1 159.219,31.662 159.131,31.75 159.131,41.783 159.385,42.037 172.825,42.037 172.974,42.186 172.974,52.451 v1@173.101,52.578 ; 71.552,39.878 73.152,39.878 74.422,41.148 74.422,65.913
  Bottom Layer w0.254: v1(68.453,79.756) 66.675,77.978 43.202,77.978 43.053,77.829 43.053,65.786 75.692,33.147 110.744,33.147 115.189,28.702 163.79,28.702 IN.1 161.833,31.917 v1@161.75,32 ; T1.5@93.996,157.029 101.292,149.733 D1.AC1 116.575,149.617 123.134,149.617 v1(123.25,149.5) 148.554,149.5 157.465,140.589 D2.C 166.751,136.8 166.243,136.292 v1(166.243,136.017) ; v1(125.25,52.25) 125.5,52.25 125.5,52.5 127.864,54.864 161.893,54.864 164.473,52.284 Out.2 166.644,52.431 173.081,52.431 173.228,52.578 v1(173.355,52.578) ; v1(136.525,147.701) 138.898,147.701 v1@140.633,145.967
  other v1: 161.375,32
NetC1_1: C1.1 IN.2 | length 93.3
  Top Layer w0.254: C1.1 88.099,57.443 91.059,54.483 v1(91.313,54.483)
  Bottom Layer w0.254: v1(91.313,54.483) 109.347,54.483 132.08,31.75 156.683,31.75 161.85,36.917 166.838,36.917 166.878,36.957 166.918,36.917 IN.2
NetC1_2: C1.2 R1.2 R2.1 | length 81.4
  Top Layer w0.254: v1@75.565,73.914 75.565,77.724 71.882,81.407 71.523,81.407 71.2,81.73 R1.2 71.2,96.52 72.953,98.273 81.89,98.273 89.865,90.297 R2.1 ; v1(82.423,69.342) 82.423,69.215 82.55,69.215 85.129,66.636 C1.2
  Bottom Layer w0.254: v1(75.311,73.66) 75.438,73.66 75.565,73.533 75.565,73.406 77.081,71.89 80.042,71.89 82.169,69.763 v1@82.169,69.469
NetC2_2: C2.2 Q1.1 R2.2 | length 50.5
  Top Layer w0.254: R2.2 106.681,84.755 123.023,68.413 ; v1@122.047,57.15 122.047,55.46 C2.2 ; v1@122.174,65.024 123.023,65.873 123.023,68.413 ; Q1.1@126.644,63.815 126.644,64.791 123.023,68.413
  Bottom Layer w0.254: v1(121.92,56.896) 121.92,58.674 120.015,60.579 120.015,63.754 121.031,64.77 121.92,64.77 v1(122.047,64.897)
NetC3_1: C3.1 C4.2 Q3.2 Q5.2 R5.2 R10.2 R13.1 | length 100.6
  Top Layer w0.254: Q3.2 50.317,113.096 50.632,113.411 C3.1@54.661,113.411 ; C3.1 C3.1@54.661,113.411 ; v1@60.706,67.056 57.402,67.056 55.152,69.306 54.902,69.306 54.354,69.854 R13.1 51.817,70.104 45.975,75.946 R10.2 49.913,87.504 R5.2 49.913,96.52 50.995,97.602 59.944,97.602 ; Q5.2 59.944,97.602 ; v1(65.068,66.465) 65.068,66.338 65.024,66.294 65.068,66.25 65.068,61.88 66.333,60.615 C4.2@66.333,60.325 ; C3.1@54.661,113.411 54.661,113.052 54.508,112.899 54.149,112.899 52,110.75 52,105.546 59.944,97.602
  Bottom Layer w0.254: v1(60.706,67.437) 60.833,67.564 63.968,67.564 v1(65.068,66.465)
NetC5_2: C5.2 C6.2 Q2.3 Q7.3 R3.1 R12.1 R16.1 | length 219.4
  Top Layer w0.254: C5.2 97.282,38.862 ; C5.2@93.904,38.862 97.282,38.862 ; v1@104.872,87.757 94.945,87.757 86.995,79.807 86.995,72.009 98.425,60.579 98.425,40.005 97.282,38.862 ; v1(105.029,87.757) 105.029,81.407 105.664,80.772 105.664,80.518 110.489,75.693 R3.1 110.489,57.48 114.808,53.161 114.808,52.959 C6.2@114.72,52.959 ; v1@113.732,87.817 114.808,86.741 114.808,82.342 114.981,82.169 Q2.3 ; v1@133.858,46.99 116.205,46.99 114.846,45.631 ; R12.1 146.81,31.496 145.362,30.048 130.429,30.048 114.846,45.631 ; 97.282,38.862 101.549,38.862 101.93,39.243 R16.1 109.6,40.385 114.846,45.631
  Bottom Layer w0.254: v1(105.029,87.757) 105.029,87.884 105.093,87.82 113.602,87.82 v1(113.665,87.884) ; v1(134.239,46.99) 134.747,46.99 Q7.3
NetC7_1: C7.1 C8.2 R6.1 | length 152
  Top Layer w0.254: C7.1 C7.1@47.855,39.878 ; R6.1 50.291,53.847 44.704,48.26 44.704,43.029 46.795,40.938 47.142,40.938 47.855,40.226 C7.1@47.855,39.878 ; C8.2 155.868,27.432 47.371,27.432 41.275,33.528 41.275,37.084 44.069,39.878 C7.1@47.855,39.878
NetC9_1: C9.1 Q2.1 R6.2 R7.1 | length 114.7
  Top Layer w0.254: R6.2 53.341,62.992 54.636,64.287 v1(56.693,64.287) ; Q2.1 112.456,83.119 112.141,82.804 112.141,80.518 117.221,75.438 v1(126.619,75.438) 126.619,75.544 127.656,76.581 R7.1 129.793,73.802 130.468,73.127 C9.1
  Bottom Layer w0.254: v1(56.693,64.287) 85.395,64.287 87.782,66.675 117.856,66.675 v1(126.619,75.438)
NetC9_2: C9.2 R8.1 | length 13.2
  Top Layer w0.254: v1(133.438,68.428) C9.2 ; v1(142.071,69.977) 143.47,69.977 R8.1
  Bottom Layer w0.254: v1(133.438,68.428) 140.208,68.428 141.106,69.326 141.286,69.326 141.937,69.977 v1(142.071,69.977)
NetC10_1: C10.1 Q7.2 R11.1 R11.2 R15.1 | length 79
  Top Layer w0.254: R11.1 131.822,89.789 R11.2 134.112,79.4 140.981,72.532 141.055,72.457 v1@141.055,45.593 ; v1(131.445,39.878) 131.445,31.623 R15.1 ; v1(140.999,45.339) 140.999,45.537 v1@141.055,45.593 ; C10.1 v1@141.055,45.593
  Bottom Layer w0.254: v1(131.445,39.878) 131.445,40.005 131.572,40.005 136.017,44.45 Q7.2 140.081,44.45 140.97,45.339 v1(140.999,45.339)
NetC10_2: C10.2 Q6.2 R8.2 R11.3 R14.1 | length 119.5
  Top Layer w0.254: v1@102.489,105.156 102.489,106.121 ; R14.1 102.489,106.121 ; R11.3 127.762,87.249 127.483,87.528 127.483,93.32 127.762,93.32 ; R8.2 147.068,69.596 146.177,69.596 145.669,69.088 ; C10.2 149.313,47.447 145.669,51.091 145.669,69.088 ; 102.489,106.121 103.708,104.902 116.18,104.902 127.762,93.32 ; 127.762,93.32 135.636,93.32 145.669,83.287 145.669,69.088
  Bottom Layer w0.254: Q6.2 v1(102.108,104.775)
NetC11_2: C11.2 R17.1 | length 35
  Top Layer w0.254: v1@134.112,50.673 134.112,53.34 R17.1 ; C11.2 156.337,31.584 v1(156.337,35.306) v1@156.464,35.433
  Bottom Layer w0.254: v1@134.112,50.419 v1(134.239,50.419) 136.637,48.021 143.114,48.021 v1@155.956,35.179
"NetCD 33V_1": "CD 33V.1" Q8.2 R13.2 | length 122.7
  Top Layer w0.254: R13.2 v1(57.404,76.378)
  Bottom Layer w0.254: v1(57.404,76.378) 92.253,76.378 Q8.2 93.751,77.876 130.175,77.876 136.449,71.603 157.418,71.603 166.751,62.27
"NetCD 33V_2": "CD 33V.2" Q9.2 R16.2 | length 101.2
  Top Layer w0.254: R16.2 112.65,32.588 115.774,29.464 153.289,29.464 154.305,30.48 154.305,31.369 Q9.2 154.559,52.324 160.568,52.324 161.671,53.427 v1@161.671,69.215
  Bottom Layer w0.254: v1(161.798,69.469) 162.073,69.469 162.454,69.088 162.687,69.088 164.505,67.27 166.751,67.27
NetD1_AC2: D1.AC2 T1.1 | length 47.6
  Bottom Layer w0.254: T1.1@73.996,157.029 86.372,144.653 D1.AC2
NetD1_NEG: "PS C3.1" "PS C5.1" D1.NEG F2.1 | length 70.4
  Top Layer w0.254: v1(122.348,154.841) 122.348,156.771 127.577,162 130.5,162 132,160.5 ; 157.607,134.366 157.734,134.493 157.734,143.256 157.861,143.383 157.861,143.51 v1(157.734,143.637)
  Bottom Layer w0.254: D1.NEG 121.92,154.813 F2.1 147.701,154.686 147.828,154.559 147.955,154.559 157.734,144.78 v1(157.734,143.637)
NetD1_POS: "PS C2.2" "PS C4.2" D1.POS F1.1 | length 72.7
  Top Layer w0.254: v1@121.221,134.81 125.603,130.429 131.191,130.429 133.985,133.223 133.985,135.057 133.147,135.895 ; 131.318,137.724 133.147,135.895 ; v1@144,159.5 139.065,154.565 139.065,138.557 136.767,136.259 ; 145.923,138.232 145.923,137.082 145.1,136.259 136.767,136.259 ; 133.147,135.895 133.345,135.895 133.35,135.89 136.398,135.89 136.767,136.259
  Bottom Layer w0.254: D1.POS 116.586,139.573 121.158,135.001 v1(121.285,135.001) ; v1(144.25,159.75) 144.25,160 144.5,160 145.409,160.909 F1.1
NetD2_A: D2.A R19.1 | length 14.8
  Top Layer w0.254: v1@160.02,143.154 R19.1
  Bottom Layer w0.254: v1(160.147,143.383) 166.497,143.383 D2.A
NetF1_2: "PS 33V.1" F1.2 pad.6 R19.2 | length 27.6
  Top Layer w0.254: v1@156.5,158.546 156.5,156.5 159.576,153.424 159.576,152.756 R19.2 163.062,152.312 164.25,153.5 164.25,157.25 pad.6
  Bottom Layer w0.254: F1.2 152.659,160.909 152.75,161 152.841,160.909 154.591,160.909 v1(156.75,158.75) ; pad.6 170,158 170.25,158.25
NetF2_2: "PS 33V.2" F2.2 | length 18.3
  Bottom Layer w0.254: F2.2 152.813,154.813 153,155 153.187,154.813 168.687,154.813 170.25,153.25
NetOut_1: Out.1 R18.2 | length 34.5
  Top Layer w0.254: R18.2 160.63,76.583 v1@160.63,54.127
  Bottom Layer w0.254: v1(160.655,53.848) 165.824,48.679 165.824,47.957 Out.1
NetPL1_1: "PS C1.1" PL1.1 T1.7 | length 76.2
  Top Layer w0.254: v1(56.388,143.51) 60.476,143.51 60.833,143.867
  Bottom Layer w0.254: v1(56.388,143.51) 46.736,143.51 44.069,140.843 43.434,140.843 PL1.1 52.324,131.445 88.941,131.445 T1.7@94.345,136.849
NetPL1_2: PL1.2 SW.1_1 SW.1_2 | length 21.2
  Top Layer w0.254: v1(56.388,158.115) SW.1_1 SW.1_2
  Bottom Layer w0.254: PL1.2 43.903,155.312 44.314,155.312 47.117,158.115 v1(56.388,158.115)
"NetPS C1_2": "PS C1.2" SW.2_1 SW.2_2 T1.9 | length 31.2
  Top Layer w0.254: SW.2_1 SW.2_1@59.817,156.665 ; SW.2_2 SW.2_1@59.817,156.665 ; v1@64.316,146.709 60.833,146.709 59.817,146.709 SW.2_1@59.817,156.665
  Bottom Layer w0.254: v1(63.754,146.685) 63.881,146.558 63.881,146.283 72.136,138.028 T1.9
NetQ1_2: Q1.2 Q2.2 Q4.3 | length 92.8
  Top Layer w0.254: Q4.3 83.033,96.393 90.435,88.991 v1@101.473,88.991 ; v1@106.033,93.802 114.884,93.802 116.23,92.456 116.23,81.534 115.915,81.219 ; Q2.2 115.915,81.219 ; v1(122.428,61.214) 122.555,61.214 122.682,61.341 122.682,61.433 123.164,61.915 Q1.2@126.655,61.915 ; v1@123.698,77.089 123.698,79.375 121.854,81.219 115.915,81.219
  Bottom Layer w0.254: v1(101.346,88.9) 101.219,89.027 101.219,89.662 103.281,91.724 103.789,91.724 v1(106.045,93.98) ; v1@122.174,61.341 122.174,61.468 127.635,66.929 127.635,75.859 126.659,76.835 v1@123.571,76.835
  other v1: 123.698,76.835
NetQ1_3: Q1.3 R3.2 | length 20.4
  Top Layer w0.254: R3.2 115.19,62.865 124.714,62.865 ; Q1.3 129.376,62.865 130.396,63.885 130.552,63.885 130.683,63.754 130.81,63.881 v1(130.81,64.135)
  Bottom Layer w0.254: v1(125.349,62.992) 129.667,62.992 v1(130.81,64.135)
NetQ3_1: Q3.1 Q4.2 R5.1 | length 61.8
  Top Layer w0.254: Q3.1 42.291,114.996 42.291,111.277 46.863,106.705 R5.1 v1(46.863,90.551) ; v1(78.537,94.386) 78.537,95.443 Q4.2
  Bottom Layer w0.254: v1(46.863,90.551) 68.809,90.551 72.644,94.386 v1(78.537,94.386)
NetQ3_3: Q3.3 Q4.1 R4.2 | length 140.3
  Top Layer w0.254: Q3.3 46.38,114.046 v1@47.447,115.113 ; v1@58.623,53.975 58.623,62.814 66.954,71.145 66.954,102.083 v1@66.218,102.819 ; v1@77.122,54.737 R4.2 77.122,95.41 Q4.1
  Bottom Layer w0.254: v1(47.5,115.5) 53.75,115.5 v1@65.75,103.5 ; v1(58.801,53.975) 60.452,53.975 61.087,54.61 v1(77.343,54.61)
  other v1: 66.25,103.25
NetQ5_1: Q5.1 Q6.1 R10.1 | length 66.5
  Top Layer w0.254: R10.1 42.925,86.182 v1(45.314,88.571) ; Q5.1 65.532,99.502 65.938,99.096 v1(65.938,95.402) v1(65.938,93.497)
  Bottom Layer w0.254: v1(45.314,88.571) 45.314,91.872 46.939,93.497 v1(65.938,93.497) ; v1(65.938,95.402) 88.109,95.402 Q6.1
NetQ5_3: Q5.3 Q6.3 R9.2 | length 53.3
  Top Layer w0.254: v1(64.821,96.524) 64.821,98.552 Q5.3 ; R9.2 79.825,114.3 83.2,114.3 84.711,112.789 84.711,103.38
  Bottom Layer w0.254: v1(64.821,96.524) Q6.3 91.203,96.524 85.111,102.616 84.709,102.616 v1(84.709,102.743)
NetQ7_1: Q7.1 R12.2 | length 13.5
  Top Layer w0.254: v1@141.859,41.91 148.59,41.91 149.86,40.64 R12.2
  Bottom Layer w0.254: Q7.1 138.049,41.783 v1(141.605,41.783)
NetQ8_1: Q8.1 R14.2 | length 45.9
  Top Layer w0.254: v1@100.127,86.436 100.127,86.085 100.457,85.755 100.457,74.208 v1@101.175,73.489 ; v1(105.539,106.045) R14.2
  Bottom Layer w0.254: Q8.1 92.71,73.533 v1(100.584,73.533) v1@100.711,73.66 ; v1(100.127,86.36) 100.127,100.633 v1(105.539,106.045)
NetQ8_3: Q8.3 Q9.3 R7.2 R17.2 R18.1 | length 170
  Top Layer w0.254: v1(109.931,78.994) 112.141,76.784 112.141,65.405 v1@112.014,65.278 ; v1@112.395,59.182 113.284,58.293 114.173,58.293 114.427,58.039 129.286,58.039 131.699,60.452 131.699,63.017 134.544,65.862 134.544,72.594 132.843,74.295 R7.2 ; v1(118.237,59.309) v1(127.635,59.309) ; R17.2 134.679,58.247 135.772,59.34 135.772,60.772 v1(136.5,61.5) ; Q9.3 151.765,71.12 154.582,73.937 v1(155.473,73.937) R18.1
  Bottom Layer w0.254: Q8.3 v1(109.931,78.994) 150.416,78.994 v1(155.473,73.937) ; v1(112.141,64.897) 112.141,59.563 112.395,59.309 v1(112.395,58.801) 117.983,58.801 v1@118.237,59.055 ; v1(127.635,59.309) 129.826,61.5 v1(136.5,61.5)
NetQ9_1: Q9.1 R15.2 | length 35.6
  Top Layer w0.254: R15.2 v1@134.749,40.82 ; v1@143.256,42.951 148.819,42.951 150.317,44.45 150.317,47.752 149.225,48.844 Q9.1
  Bottom Layer w0.254: v1(134.62,40.64) 134.874,40.894 134.874,40.855 135.089,40.64 141.899,40.64 143.002,41.743 v1(143.002,43.053)
pads on no net: PL1.E

## Silkscreen, mask and mechanical layers (free items; w line width, h text height)
Top Overlay:
  text "DINA MIHAI" at 112.5,116.5 h6 r359.01
  text "P21 25W Mosfet audio amplifier" at 120.75,102.25 h4 r359.01